# Altium PCB LEDControl1.PcbDoc (part 6 of 6)
Units mm, origin at the board's own origin, x right, y up, seen from the top; angles counter-clockwise.
Board outline 380 x 185 mm, 2 copper layers (Top Layer, Bottom Layer), stack 0.533 mm thick; 673 components, 368 nets, 1993 pads, 2553 vias.
Unrouted connection lines stored in the file: 1155.
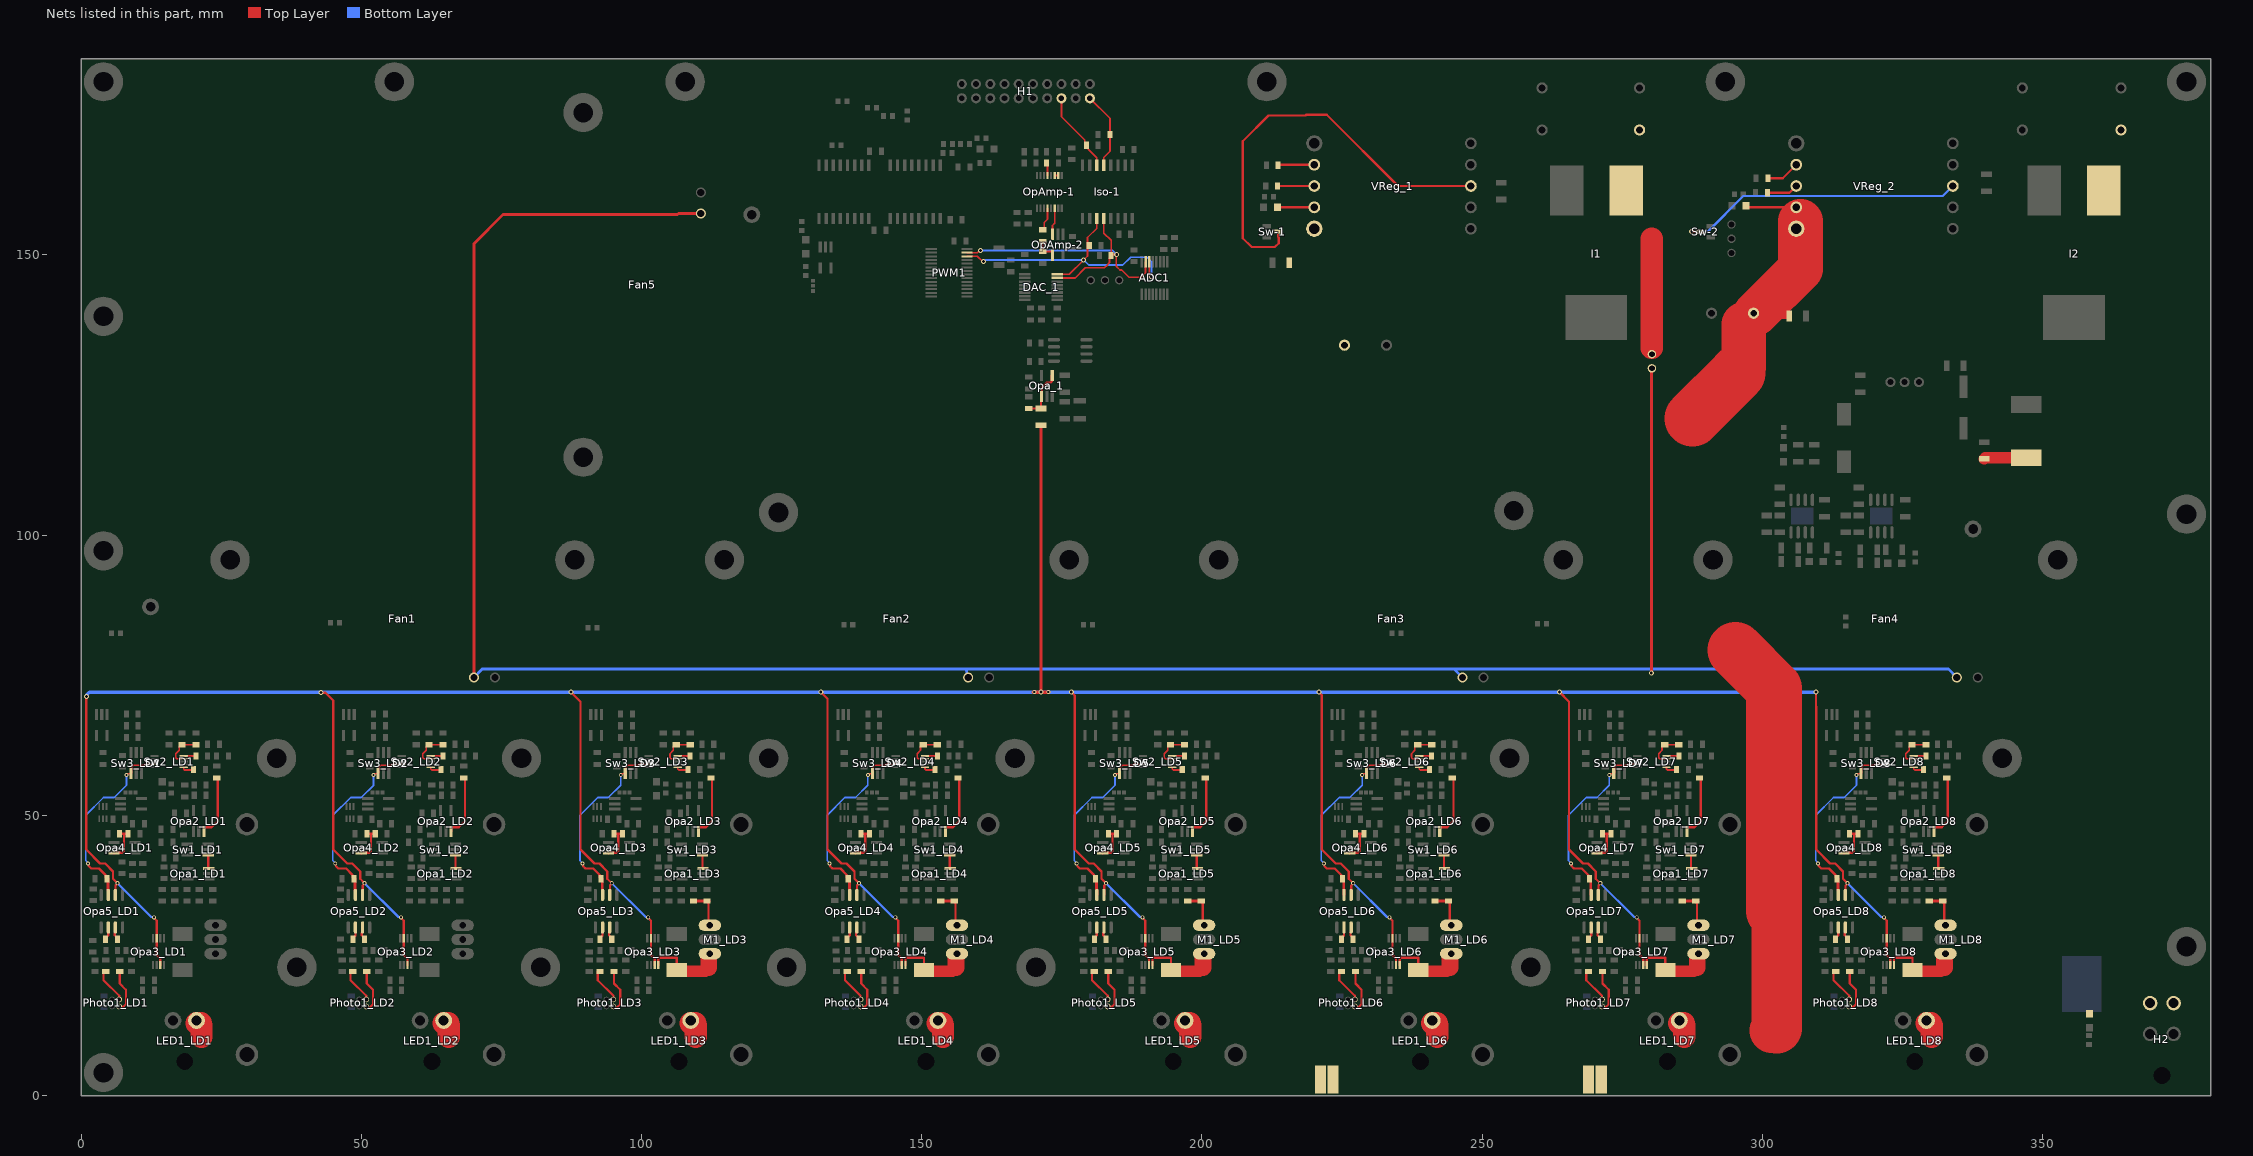
[diagram p6: the nets of this part, all layers, seen from the top]

## Via types
v1: diameter 0.7, hole 0.4, Top Layer to Bottom Layer, tented both sides, 1874 vias
v2: diameter 0.8, hole 0.5, Top Layer to Bottom Layer, tented both sides, 512 vias
v3: diameter 0.9, hole 0.5, Top Layer to Bottom Layer, tented both sides, 158 vias
v4: diameter 1.27, hole 0.711, Top Layer to Bottom Layer, tented both sides, 8 vias
v5: diameter 1.2, hole 0.7, Top Layer to Bottom Layer, tented both sides, 1 vias

## Nets (pads, with @x,y where several pads share a name; then routed paths per layer and width w, separated by ;. In a path a pad name is that pad's centre, name@x,y a point inside that pad or via, vN(x,y) a via of type N, cw(c..) or ccw(c..) an arc to the next point about the centre after c; other vN are vias at no path point) (continued)
NetM1_LD3_1: M1_LD3.1 R1-1_LD3.2 R2-1_LD3.1 | length 7
  Top Layer w0.4: M1_LD3.1@111.95,30.64 R1-1_LD3.2@111.95,34.65
  Top Layer w0.5: R2-1_LD3.1@109.3,34.7 R1-1_LD3.2@111.7,34.7
  Top Layer w0.8: R1-1_LD3.2@111.7,34.7 111.9,34.7 R1-1_LD3.2@111.95,34.65 ; M1_LD3.1@111.95,30.64 M1_LD3.1@112.2,30.39
NetM1_LD3_3: M1_LD3.3 Opa3_LD3.8 R5-1_LD3.1 | length 14.7
  Top Layer w0.4: Opa3_LD3.8@103,23.273 103,24.6 106.3,24.6 106.3,22.2 R5-1_LD3.1@106.5,22.2
  Top Layer w2: R5-1_LD3.1@106.5,22.2 111.4,22.2 ; M1_LD3.3@112,24.827 cw(c112.683,24.827) M1_LD3.3@112.2,25.31
  Top Layer w3: 112,22.8 M1_LD3.3@112,24.827
NetM1_LD4_1: M1_LD4.1 R1-1_LD4.2 R2-1_LD4.1 | length 7
  Top Layer w0.4: M1_LD4.1@156.05,30.64 R1-1_LD4.2@156.05,34.65
  Top Layer w0.5: R2-1_LD4.1@153.4,34.7 R1-1_LD4.2@155.8,34.7
  Top Layer w0.8: R1-1_LD4.2@155.8,34.7 156,34.7 R1-1_LD4.2@156.05,34.65 ; M1_LD4.1@156.05,30.64 M1_LD4.1@156.3,30.39
NetM1_LD4_3: M1_LD4.3 Opa3_LD4.8 R5-1_LD4.1 | length 14.7
  Top Layer w0.4: Opa3_LD4.8@147.1,23.273 147.1,24.6 150.4,24.6 150.4,22.2 R5-1_LD4.1@150.6,22.2
  Top Layer w2: R5-1_LD4.1@150.6,22.2 155.5,22.2 ; M1_LD4.3@156.1,24.827 cw(c156.783,24.827) M1_LD4.3@156.3,25.31
  Top Layer w3: 156.1,22.8 M1_LD4.3@156.1,24.827
NetM1_LD5_1: M1_LD5.1 R1-1_LD5.2 R2-1_LD5.1 | length 7
  Top Layer w0.4: M1_LD5.1@200.15,30.64 R1-1_LD5.2@200.15,34.65
  Top Layer w0.5: R2-1_LD5.1@197.5,34.7 R1-1_LD5.2@199.9,34.7
  Top Layer w0.8: R1-1_LD5.2@199.9,34.7 200.1,34.7 R1-1_LD5.2@200.15,34.65 ; M1_LD5.1@200.15,30.64 M1_LD5.1@200.4,30.39
NetM1_LD5_3: M1_LD5.3 Opa3_LD5.8 R5-1_LD5.1 | length 14.7
  Top Layer w0.4: Opa3_LD5.8@191.2,23.273 191.2,24.6 194.5,24.6 194.5,22.2 R5-1_LD5.1@194.7,22.2
  Top Layer w2: R5-1_LD5.1@194.7,22.2 199.6,22.2 ; M1_LD5.3@200.2,24.827 cw(c200.883,24.827) M1_LD5.3@200.4,25.31
  Top Layer w3: 200.2,22.8 M1_LD5.3@200.2,24.827
NetM1_LD6_1: M1_LD6.1 R1-1_LD6.2 R2-1_LD6.1 | length 7
  Top Layer w0.4: M1_LD6.1@244.25,30.64 R1-1_LD6.2@244.25,34.65
  Top Layer w0.5: R2-1_LD6.1@241.6,34.7 R1-1_LD6.2@244,34.7
  Top Layer w0.8: R1-1_LD6.2@244,34.7 244.2,34.7 R1-1_LD6.2@244.25,34.65 ; M1_LD6.1@244.25,30.64 M1_LD6.1@244.5,30.39
NetM1_LD6_3: M1_LD6.3 Opa3_LD6.8 R5-1_LD6.1 | length 14.7
  Top Layer w0.4: Opa3_LD6.8@235.3,23.273 235.3,24.6 238.6,24.6 238.6,22.2 R5-1_LD6.1@238.8,22.2
  Top Layer w2: R5-1_LD6.1@238.8,22.2 243.7,22.2 ; M1_LD6.3@244.3,24.827 cw(c244.983,24.827) M1_LD6.3@244.5,25.31
  Top Layer w3: 244.3,22.8 M1_LD6.3@244.3,24.827
NetM1_LD7_1: M1_LD7.1 R1-1_LD7.2 R2-1_LD7.1 | length 7
  Top Layer w0.4: M1_LD7.1@288.35,30.64 R1-1_LD7.2@288.35,34.65
  Top Layer w0.5: R2-1_LD7.1@285.7,34.7 R1-1_LD7.2@288.1,34.7
  Top Layer w0.8: R1-1_LD7.2@288.1,34.7 288.3,34.7 R1-1_LD7.2@288.35,34.65 ; M1_LD7.1@288.35,30.64 M1_LD7.1@288.6,30.39
NetM1_LD7_3: M1_LD7.3 Opa3_LD7.8 R5-1_LD7.1 | length 14.7
  Top Layer w0.4: Opa3_LD7.8@279.4,23.273 279.4,24.6 282.7,24.6 282.7,22.2 R5-1_LD7.1@282.9,22.2
  Top Layer w2: R5-1_LD7.1@282.9,22.2 287.8,22.2 ; M1_LD7.3@288.4,24.827 cw(c289.083,24.827) M1_LD7.3@288.6,25.31
  Top Layer w3: 288.4,22.8 M1_LD7.3@288.4,24.827
NetM1_LD8_1: M1_LD8.1 R1-1_LD8.2 R2-1_LD8.1 | length 7
  Top Layer w0.4: M1_LD8.1@332.45,30.64 R1-1_LD8.2@332.45,34.65
  Top Layer w0.5: R2-1_LD8.1@329.8,34.7 R1-1_LD8.2@332.2,34.7
  Top Layer w0.8: R1-1_LD8.2@332.2,34.7 332.4,34.7 R1-1_LD8.2@332.45,34.65 ; M1_LD8.1@332.45,30.64 M1_LD8.1@332.7,30.39
NetM1_LD8_3: M1_LD8.3 Opa3_LD8.8 R5-1_LD8.1 | length 14.7
  Top Layer w0.4: Opa3_LD8.8@323.5,23.273 323.5,24.6 326.8,24.6 326.8,22.2 R5-1_LD8.1@327,22.2
  Top Layer w2: R5-1_LD8.1@327,22.2 331.9,22.2 ; M1_LD8.3@332.5,24.827 cw(c333.183,24.827) M1_LD8.3@332.7,25.31
  Top Layer w3: 332.5,22.8 M1_LD8.3@332.5,24.827
NetOpa1_LD1_3: Opa1_LD1.3 Sw1_LD1.4 | length 2.5
  Top Layer w0.4: Sw1_LD1.4@22.7,42.95 22.7,40.625 22.775,40.55 Opa1_LD1.3@22.8,40.55
NetOpa1_LD2_3: Opa1_LD2.3 Sw1_LD2.4 | length 2.5
  Top Layer w0.4: Sw1_LD2.4@66.8,42.95 66.8,40.625 66.875,40.55 Opa1_LD2.3@66.9,40.55
NetOpa1_LD3_3: Opa1_LD3.3 Sw1_LD3.4 | length 2.5
  Top Layer w0.4: Sw1_LD3.4@110.9,42.95 110.9,40.625 110.975,40.55 Opa1_LD3.3@111,40.55
NetOpa1_LD4_3: Opa1_LD4.3 Sw1_LD4.4 | length 2.5
  Top Layer w0.4: Sw1_LD4.4@155,42.95 155,40.625 155.075,40.55 Opa1_LD4.3@155.1,40.55
NetOpa1_LD5_3: Opa1_LD5.3 Sw1_LD5.4 | length 2.5
  Top Layer w0.4: Sw1_LD5.4@199.1,42.95 199.1,40.625 199.175,40.55 Opa1_LD5.3@199.2,40.55
NetOpa1_LD6_3: Opa1_LD6.3 Sw1_LD6.4 | length 2.5
  Top Layer w0.4: Sw1_LD6.4@243.2,42.95 243.2,40.625 243.275,40.55 Opa1_LD6.3@243.3,40.55
NetOpa1_LD7_3: Opa1_LD7.3 Sw1_LD7.4 | length 2.5
  Top Layer w0.4: Sw1_LD7.4@287.3,42.95 287.3,40.625 287.375,40.55 Opa1_LD7.3@287.4,40.55
NetOpa1_LD8_3: Opa1_LD8.3 Sw1_LD8.4 | length 2.5
  Top Layer w0.4: Sw1_LD8.4@331.4,42.95 331.4,40.625 331.475,40.55 Opa1_LD8.3@331.5,40.55
NetOpa2_LD1_3: Opa2_LD1.3 R3-4_LD1.1 | length 11.4
  Top Layer w0.4: Opa2_LD1.3@21.95,47.1 21.95,47.825 22.025,47.9 23.3,47.9 24.4,49 24.4,56.5 R3-4_LD1.1@24.2,56.7
NetOpa2_LD2_3: Opa2_LD2.3 R3-4_LD2.1 | length 11.4
  Top Layer w0.4: Opa2_LD2.3@66.05,47.1 66.05,47.825 66.125,47.9 67.4,47.9 68.5,49 68.5,56.5 R3-4_LD2.1@68.3,56.7
NetOpa2_LD3_3: Opa2_LD3.3 R3-4_LD3.1 | length 11.4
  Top Layer w0.4: Opa2_LD3.3@110.15,47.1 110.15,47.825 110.225,47.9 111.5,47.9 112.6,49 112.6,56.5 R3-4_LD3.1@112.4,56.7
NetOpa2_LD4_3: Opa2_LD4.3 R3-4_LD4.1 | length 11.4
  Top Layer w0.4: Opa2_LD4.3@154.25,47.1 154.25,47.825 154.325,47.9 155.6,47.9 156.7,49 156.7,56.5 R3-4_LD4.1@156.5,56.7
NetOpa2_LD5_3: Opa2_LD5.3 R3-4_LD5.1@200.6,56.7 | length 11.4
  Top Layer w0.4: Opa2_LD5.3@198.35,47.1 198.35,47.825 198.425,47.9 199.7,47.9 200.8,49 200.8,56.5 R3-4_LD5.1@200.6,56.7
NetOpa2_LD6_3: Opa2_LD6.3 R3-4_LD6.1 | length 11.4
  Top Layer w0.4: Opa2_LD6.3@242.45,47.1 242.45,47.825 242.525,47.9 243.8,47.9 244.9,49 244.9,56.5 R3-4_LD6.1@244.7,56.7
NetOpa2_LD7_3: Opa2_LD7.3 R3-4_LD7.1 | length 11.4
  Top Layer w0.4: Opa2_LD7.3@286.55,47.1 286.55,47.825 286.625,47.9 287.9,47.9 289,49 289,56.5 R3-4_LD7.1@288.8,56.7
NetOpa2_LD8_3: Opa2_LD8.3 R3-4_LD8.1 | length 11.4
  Top Layer w0.4: Opa2_LD8.3@330.65,47.1 330.65,47.825 330.725,47.9 332,47.9 333.1,49 333.1,56.5 R3-4_LD8.1@332.9,56.7
NetOpa4_LD1_3: Opa4_LD1.3 R6-1_LD1.2 R7-1_LD1.1 | length 6.5
  Top Layer w0.4: Opa4_LD1.3@5.9,43.25 5.975,43.325 7.325,43.325 7.65,43.65 7.65,46.7 ; R7-1_LD1.1@6.9,46.7 7.65,46.7 ; R6-1_LD1.2@8.4,46.7 7.65,46.7
NetOpa4_LD2_3: Opa4_LD2.3 R6-1_LD2.2 R7-1_LD2.1 | length 6.5
  Top Layer w0.4: Opa4_LD2.3@50,43.25 50.075,43.325 51.425,43.325 51.75,43.65 51.75,46.7 ; R7-1_LD2.1@51,46.7 51.75,46.7 ; R6-1_LD2.2@52.5,46.7 51.75,46.7
NetOpa4_LD3_3: Opa4_LD3.3 R6-1_LD3.2 R7-1_LD3.1 | length 6.5
  Top Layer w0.4: Opa4_LD3.3@94.1,43.25 94.175,43.325 95.525,43.325 95.85,43.65 95.85,46.7 ; R7-1_LD3.1@95.1,46.7 95.85,46.7 ; R6-1_LD3.2@96.6,46.7 95.85,46.7
NetOpa4_LD4_3: Opa4_LD4.3 R6-1_LD4.2 R7-1_LD4.1 | length 6.5
  Top Layer w0.4: Opa4_LD4.3@138.2,43.25 138.275,43.325 139.625,43.325 139.95,43.65 139.95,46.7 ; R7-1_LD4.1@139.2,46.7 139.95,46.7 ; R6-1_LD4.2@140.7,46.7 139.95,46.7
NetOpa4_LD5_3: Opa4_LD5.3 R6-1_LD5.2 R7-1_LD5.1 | length 6.5
  Top Layer w0.4: Opa4_LD5.3@182.3,43.25 182.375,43.325 183.725,43.325 184.05,43.65 184.05,46.7 ; R7-1_LD5.1@183.3,46.7 184.05,46.7 ; R6-1_LD5.2@184.8,46.7 184.05,46.7
NetOpa4_LD6_3: Opa4_LD6.3 R6-1_LD6.2 R7-1_LD6.1 | length 6.5
  Top Layer w0.4: Opa4_LD6.3@226.4,43.25 226.475,43.325 227.825,43.325 228.15,43.65 228.15,46.7 ; R7-1_LD6.1@227.4,46.7 228.15,46.7 ; R6-1_LD6.2@228.9,46.7 228.15,46.7
NetOpa4_LD7_3: Opa4_LD7.3 R6-1_LD7.2 R7-1_LD7.1 | length 6.5
  Top Layer w0.4: Opa4_LD7.3@270.5,43.25 270.575,43.325 271.925,43.325 272.25,43.65 272.25,46.7 ; R7-1_LD7.1@271.5,46.7 272.25,46.7 ; R6-1_LD7.2@273,46.7 272.25,46.7
NetOpa4_LD8_3: Opa4_LD8.3 R6-1_LD8.2 R7-1_LD8.1 | length 6.5
  Top Layer w0.4: Opa4_LD8.3@314.6,43.25 314.675,43.325 316.025,43.325 316.35,43.65 316.35,46.7 ; R7-1_LD8.1@315.6,46.7 316.35,46.7 ; R6-1_LD8.2@317.1,46.7 316.35,46.7
NetOpa5_LD1_2: Opa5_LD1.2 R10-1_LD1.2 | length 2.5
  Top Layer w0.4: R10-1_LD1.2@4.4,27.9 4.4,28.1 4.86,28.56 Opa5_LD1.2@4.86,30.2
NetOpa5_LD1_3: Opa5_LD1.3 R10-1_LD1.1 | length 2.4
  Top Layer w0.4: Opa5_LD1.3@6.13,30 6.13,29.146 6.001,29.017 6.001,28.599 6.5,28.1 R10-1_LD1.1@6.5,27.9
NetOpa5_LD2_2: Opa5_LD2.2 R10-1_LD2.2 | length 2.5
  Top Layer w0.4: R10-1_LD2.2@48.5,27.9 48.5,28.1 48.96,28.56 Opa5_LD2.2@48.96,30.2
NetOpa5_LD2_3: Opa5_LD2.3 R10-1_LD2.1 | length 2.4
  Top Layer w0.4: Opa5_LD2.3@50.23,30 50.23,29.146 50.101,29.017 50.101,28.599 50.6,28.1 R10-1_LD2.1@50.6,27.9
NetOpa5_LD3_2: Opa5_LD3.2 R10-1_LD3.2 | length 2.5
  Top Layer w0.4: R10-1_LD3.2@92.6,27.9 92.6,28.1 93.06,28.56 Opa5_LD3.2@93.06,30.2
NetOpa5_LD3_3: Opa5_LD3.3 R10-1_LD3.1 | length 2.4
  Top Layer w0.4: Opa5_LD3.3@94.33,30 94.33,29.146 94.201,29.017 94.201,28.599 94.7,28.1 R10-1_LD3.1@94.7,27.9
NetOpa5_LD4_2: Opa5_LD4.2 R10-1_LD4.2 | length 2.5
  Top Layer w0.4: R10-1_LD4.2@136.7,27.9 136.7,28.1 137.16,28.56 Opa5_LD4.2@137.16,30.2
NetOpa5_LD4_3: Opa5_LD4.3 R10-1_LD4.1 | length 2.4
  Top Layer w0.4: Opa5_LD4.3@138.43,30 138.43,29.146 138.301,29.017 138.301,28.599 138.8,28.1 R10-1_LD4.1@138.8,27.9
NetOpa5_LD5_2: Opa5_LD5.2 R10-1_LD5.2 | length 2.5
  Top Layer w0.4: R10-1_LD5.2@180.8,27.9 180.8,28.1 181.26,28.56 Opa5_LD5.2@181.26,30.2
NetOpa5_LD5_3: Opa5_LD5.3 R10-1_LD5.1 | length 2.4
  Top Layer w0.4: Opa5_LD5.3@182.53,30 182.53,29.146 182.401,29.017 182.401,28.599 182.9,28.1 R10-1_LD5.1@182.9,27.9
NetOpa5_LD6_2: Opa5_LD6.2 R10-1_LD6.2 | length 2.5
  Top Layer w0.4: R10-1_LD6.2@224.9,27.9 224.9,28.1 225.36,28.56 Opa5_LD6.2@225.36,30.2
NetOpa5_LD6_3: Opa5_LD6.3 R10-1_LD6.1 | length 2.4
  Top Layer w0.4: Opa5_LD6.3@226.63,30 226.63,29.146 226.501,29.017 226.501,28.599 227,28.1 R10-1_LD6.1@227,27.9
NetOpa5_LD7_2: Opa5_LD7.2 R10-1_LD7.2 | length 2.5
  Top Layer w0.4: R10-1_LD7.2@269,27.9 269,28.1 269.46,28.56 Opa5_LD7.2@269.46,30.2
NetOpa5_LD7_3: Opa5_LD7.3 R10-1_LD7.1 | length 2.4
  Top Layer w0.4: Opa5_LD7.3@270.73,30 270.73,29.146 270.601,29.017 270.601,28.599 271.1,28.1 R10-1_LD7.1@271.1,27.9
NetOpa5_LD8_2: Opa5_LD8.2 R10-1_LD8.2 | length 2.5
  Top Layer w0.4: R10-1_LD8.2@313.1,27.9 313.1,28.1 313.56,28.56 Opa5_LD8.2@313.56,30.2
NetOpa5_LD8_3: Opa5_LD8.3 R10-1_LD8.1 | length 2.4
  Top Layer w0.4: Opa5_LD8.3@314.83,30 314.83,29.146 314.701,29.017 314.701,28.599 315.2,28.1 R10-1_LD8.1@315.2,27.9
NetOpa_1_1: Opa_1.1 Opa_1.4 R9-1.1 R10-1.1 | length 9.3
  Top Layer w0.4: R10-1.1@169.1,122.6 R9-1.1@171.3,122.6 171.3,123.925 171.4,124.025 Opa_1.1@171.4,124.75 171.475,124.825 171.475,126.384 172.316,127.225 172.991,127.225 173.225,127.459 173.225,128.425 Opa_1.4@173.3,128.5
NetOpAmp-1_6: OpAmp-1.6 OpAmp-2.3 | length 4.8
  Top Layer w0.3: OpAmp-2.3@173.35,153.7 173.35,155.25 173.735,155.635 OpAmp-1.6@173.735,158.329
NetOpAmp-1_10: OpAmp-1.10 OpAmp-1.11 | length 0.6
  Top Layer w0.3: OpAmp-1.11@173.735,164.171 OpAmp-1.10@174.37,164.171
NetOpAmp-1_13: OpAmp-1.13 R3-2.1 | length 2.3
  Top Layer w0.3: R3-2.1@172.3,166.4 172.465,166.235 OpAmp-1.13@172.465,164.171
NetOpAmp-2_4: OpAmp-2.4 R3-3.2 R3-4.2 | length 4.1
  Top Layer w0.3: R3-4.2@171.6,152.4 R3-3.2@171.6,150.6 173.225,150.6 173.35,150.475 OpAmp-2.4@173.35,149.95
NetPhoto1_LD1_3: Photo1_LD1.3 S.2@6.9,22.1 | length 7.7
  Top Layer w0.4: Photo1_LD1.3@6.8,15.7 7.4,15.7 8,16.3 8,18.9 6.9,20 S.2@6.9,22.1
NetPhoto1_LD1_4: Photo1_LD1.4 S.2@4.4,22.1 | length 6.3
  Top Layer w0.4: S.2@4,22.1 4,20.6 6.8,17.8 Photo1_LD1.4@6.8,16.95
NetPhoto1_LD2_3: Photo1_LD2.3 S.2@51,22.1 | length 7.7
  Top Layer w0.4: Photo1_LD2.3@50.9,15.7 51.5,15.7 52.1,16.3 52.1,18.9 51,20 S.2@51,22.1
NetPhoto1_LD2_4: Photo1_LD2.4 S.2@48.5,22.1 | length 6.3
  Top Layer w0.4: S.2@48.1,22.1 48.1,20.6 50.9,17.8 Photo1_LD2.4@50.9,16.95
NetPhoto1_LD3_3: Photo1_LD3.3 S.2@95.1,22.1 | length 7.7
  Top Layer w0.4: Photo1_LD3.3@95,15.7 95.6,15.7 96.2,16.3 96.2,18.9 95.1,20 S.2@95.1,22.1
NetPhoto1_LD3_4: Photo1_LD3.4 S.2@92.6,22.1 | length 6.3
  Top Layer w0.4: S.2@92.2,22.1 92.2,20.6 95,17.8 Photo1_LD3.4@95,16.95
NetPhoto1_LD4_3: Photo1_LD4.3 S.2@139.2,22.1 | length 7.7
  Top Layer w0.4: Photo1_LD4.3@139.1,15.7 139.7,15.7 140.3,16.3 140.3,18.9 139.2,20 S.2@139.2,22.1
NetPhoto1_LD4_4: Photo1_LD4.4 S.2@136.7,22.1 | length 6.3
  Top Layer w0.4: S.2@136.3,22.1 136.3,20.6 139.1,17.8 Photo1_LD4.4@139.1,16.95
NetPhoto1_LD5_3: Photo1_LD5.3 R1-7_LD5.2 | length 7.7
  Top Layer w0.4: Photo1_LD5.3@183.2,15.7 183.8,15.7 184.4,16.3 184.4,18.9 183.3,20 R1-7_LD5.2@183.3,22.1
NetPhoto1_LD5_4: Photo1_LD5.4 R1-6_LD5.2 | length 6.3
  Top Layer w0.4: R1-6_LD5.2@180.4,22.1 180.4,20.6 183.2,17.8 Photo1_LD5.4@183.2,16.95
NetPhoto1_LD6_3: Photo1_LD6.3 S.2@227.4,22.1 | length 7.7
  Top Layer w0.4: Photo1_LD6.3@227.3,15.7 227.9,15.7 228.5,16.3 228.5,18.9 227.4,20 S.2@227.4,22.1
NetPhoto1_LD6_4: Photo1_LD6.4 S.2@224.9,22.1 | length 6.3
  Top Layer w0.4: S.2@224.5,22.1 224.5,20.6 227.3,17.8 Photo1_LD6.4@227.3,16.95
NetPhoto1_LD7_3: Photo1_LD7.3 S.2@271.5,22.1 | length 7.7
  Top Layer w0.4: Photo1_LD7.3@271.4,15.7 272,15.7 272.6,16.3 272.6,18.9 271.5,20 S.2@271.5,22.1
NetPhoto1_LD7_4: Photo1_LD7.4 S.2@269,22.1 | length 6.3
  Top Layer w0.4: S.2@268.6,22.1 268.6,20.6 271.4,17.8 Photo1_LD7.4@271.4,16.95
NetPhoto1_LD8_3: Photo1_LD8.3 S.2@315.6,22.1 | length 7.7
  Top Layer w0.4: Photo1_LD8.3@315.5,15.7 316.1,15.7 316.7,16.3 316.7,18.9 315.6,20 S.2@315.6,22.1
NetPhoto1_LD8_4: Photo1_LD8.4 S.2@313.1,22.1 | length 6.3
  Top Layer w0.4: S.2@312.7,22.1 312.7,20.6 315.5,17.8 Photo1_LD8.4@315.5,16.95
NetR1-4_LD1_1: S.1@20.5,60.6 Sw2_LD1.10 | length 2.2
  Top Layer w0.3: Sw2_LD1.10@18.3,60.6 S.1@20.5,60.6
NetR1-4_LD2_1: S.1@64.6,60.6 Sw2_LD2.10 | length 2.2
  Top Layer w0.3: Sw2_LD2.10@62.4,60.6 S.1@64.6,60.6
NetR1-4_LD3_1: S.1@108.7,60.6 Sw2_LD3.10 | length 2.2
  Top Layer w0.3: Sw2_LD3.10@106.5,60.6 S.1@108.7,60.6
NetR1-4_LD4_1: S.1@152.8,60.6 Sw2_LD4.10 | length 2.2
  Top Layer w0.3: Sw2_LD4.10@150.6,60.6 S.1@152.8,60.6
NetR1-4_LD5_1: R3-4_LD5.1@196.9,60.6 Sw2_LD5.10 | length 2.2
  Top Layer w0.3: Sw2_LD5.10@194.7,60.6 R3-4_LD5.1@196.9,60.6
NetR1-4_LD6_1: S.1@241,60.6 Sw2_LD6.10 | length 2.2
  Top Layer w0.3: Sw2_LD6.10@238.8,60.6 S.1@241,60.6
NetR1-4_LD7_1: S.1@285.1,60.6 Sw2_LD7.10 | length 2.2
  Top Layer w0.3: Sw2_LD7.10@282.9,60.6 S.1@285.1,60.6
NetR1-4_LD8_1: R1-4.1 Sw2_LD8.10 | length 2.2
  Top Layer w0.3: Sw2_LD8.10@327,60.6 R1-4.1@329.2,60.6
NetR1-5_LD1_2: R1-5_LD1.2 R14-1_LD1.1 Sw2_LD1.9 | length 6.9
  Top Layer w0.3: Sw2_LD1.9@18.3,60.1 17.1,60.1 16.9,60.3 16.9,61 17.5,61.6 17.5,62.3 17.8,62.6 R14-1_LD1.1@18,62.6 R1-5_LD1.2@20.5,62.6
NetR1-5_LD2_2: R1-5_LD2.2 R14-1_LD2.1 Sw2_LD2.9 | length 6.9
  Top Layer w0.3: Sw2_LD2.9@62.4,60.1 61.2,60.1 61,60.3 61,61 61.6,61.6 61.6,62.3 61.9,62.6 R14-1_LD2.1@62.1,62.6 R1-5_LD2.2@64.6,62.6
NetR1-5_LD3_2: R1-5_LD3.2 R14-1_LD3.1 Sw2_LD3.9 | length 6.9
  Top Layer w0.3: Sw2_LD3.9@106.5,60.1 105.3,60.1 105.1,60.3 105.1,61 105.7,61.6 105.7,62.3 106,62.6 R14-1_LD3.1@106.2,62.6 R1-5_LD3.2@108.7,62.6
NetR1-5_LD4_2: R1-5_LD4.2 R14-1_LD4.1 Sw2_LD4.9 | length 6.9
  Top Layer w0.3: Sw2_LD4.9@150.6,60.1 149.4,60.1 149.2,60.3 149.2,61 149.8,61.6 149.8,62.3 150.1,62.6 R14-1_LD4.1@150.3,62.6 R1-5_LD4.2@152.8,62.6
NetR1-5_LD5_2: R1-5_LD5.2 R14-1_LD5.1 Sw2_LD5.9 | length 6.9
  Top Layer w0.3: Sw2_LD5.9@194.7,60.1 193.5,60.1 193.3,60.3 193.3,61 193.9,61.6 193.9,62.3 194.2,62.6 R14-1_LD5.1@194.4,62.6 R1-5_LD5.2@196.9,62.6
NetR1-5_LD6_2: R1-5_LD6.2 R14-1_LD6.1 Sw2_LD6.9 | length 6.9
  Top Layer w0.3: Sw2_LD6.9@238.8,60.1 237.6,60.1 237.4,60.3 237.4,61 238,61.6 238,62.3 238.3,62.6 R14-1_LD6.1@238.5,62.6 R1-5_LD6.2@241,62.6
NetR1-5_LD7_2: R1-5_LD7.2 R14-1_LD7.1 Sw2_LD7.9 | length 6.9
  Top Layer w0.3: Sw2_LD7.9@282.9,60.1 281.7,60.1 281.5,60.3 281.5,61 282.1,61.6 282.1,62.3 282.4,62.6 R14-1_LD7.1@282.6,62.6 R1-5_LD7.2@285.1,62.6
NetR1-5_LD8_2: R1-5_LD8.2 R14-1_LD8.1 Sw2_LD8.9 | length 6.9
  Top Layer w0.3: Sw2_LD8.9@327,60.1 325.8,60.1 325.6,60.3 325.6,61 326.2,61.6 326.2,62.3 326.5,62.6 R14-1_LD8.1@326.7,62.6 R1-5_LD8.2@329.2,62.6
NetR3-3_LD1_2: R3-3_LD1.2 Sw2_LD1.6 | length 2.2
  Top Layer w0.3: Sw2_LD1.6@18.3,58.6 18.3,58.276 18.476,58.1 20,58.1 R3-3_LD1.2@20.1,58.2
NetR3-3_LD2_2: R3-3_LD2.2 Sw2_LD2.6 | length 2.2
  Top Layer w0.3: Sw2_LD2.6@62.4,58.6 62.4,58.276 62.576,58.1 64.1,58.1 R3-3_LD2.2@64.2,58.2
NetR3-3_LD3_2: R3-3_LD3.2 Sw2_LD3.6 | length 2.2
  Top Layer w0.3: Sw2_LD3.6@106.5,58.6 106.5,58.276 106.676,58.1 108.2,58.1 R3-3_LD3.2@108.3,58.2
NetR3-3_LD4_2: R3-3_LD4.2 Sw2_LD4.6 | length 2.2
  Top Layer w0.3: Sw2_LD4.6@150.6,58.6 150.6,58.276 150.776,58.1 152.3,58.1 R3-3_LD4.2@152.4,58.2
NetR3-3_LD5_2: R3-3_LD5.2 Sw2_LD5.6 | length 2.2
  Top Layer w0.3: Sw2_LD5.6@194.7,58.6 194.7,58.276 194.876,58.1 196.4,58.1 R3-3_LD5.2@196.5,58.2
NetR3-3_LD6_2: R3-3_LD6.2 Sw2_LD6.6 | length 2.2
  Top Layer w0.3: Sw2_LD6.6@238.8,58.6 238.8,58.276 238.976,58.1 240.5,58.1 R3-3_LD6.2@240.6,58.2
NetR3-3_LD7_2: R3-3_LD7.2 Sw2_LD7.6 | length 2.2
  Top Layer w0.3: Sw2_LD7.6@282.9,58.6 282.9,58.276 283.076,58.1 284.6,58.1 R3-3_LD7.2@284.7,58.2
NetR3-3_LD8_2: R3-3_LD8.2 Sw2_LD8.6 | length 2.2
  Top Layer w0.3: Sw2_LD8.6@327,58.6 327,58.276 327.176,58.1 328.7,58.1 R3-3_LD8.2@328.8,58.2
NetRLim-1_1: RLim-1.1 VReg_1.5 | length 6.5
  Top Layer w0.4: RLim-1.1@213.6,166 213.71,166.11 VReg_1.5@220.06,166.11
NetRLim-2_1: RLim-2.1 VReg_2.5 | length 6.1
  Top Layer w0.4: RLim-2.1@301,163.7 303.65,163.7 VReg_2.5@306.06,166.11
NetRTrim1_1: RTrim1.1 VReg_1.6 | length 6.6
  Top Layer w0.4: RTrim1.1@213.5,162.3 VReg_1.6@220.06,162.3
NetRTrim2_1: RTrim2.1 VReg_2.6 | length 5.7
  Top Layer w0.4: RTrim2.1@300.9,161.1 304.86,161.1 VReg_2.6@306.06,162.3
NetSw-1_3: Sw-1.3 VReg_1.2 | length 74.7
  Top Layer w0.4: Sw-1.3@213.6,154.15 213.6,153.3 213.7,153.2 213.7,152.1 213,151.4 208.9,151.4 207.3,153 207.3,170.3 211.9,174.9 218.5,174.9 218.6,175 222.3,175 235,162.3 VReg_1.2@248,162.3
NetSw-2_3: Sw-2.3 VReg_2.2 | length 52.1
  Top Layer w0.4: v3(287.4,154.2) 287.45,154.15 Sw-2.3@288.8,154.15 288.75,154.2 Sw-2.3@288.1,154.2
  Bottom Layer w0.4: v3(287.4,154.2) 290.299,154.2 296.599,160.5 332.2,160.5 VReg_2.2@334,162.3
OpticalSense_LD1: Opa5_LD1.7 R11-2_LD1.1 Sw2_LD1.4 Sw3_LD1.1 | length 34.3
  Top Layer w0.3: v1(1.261,41.407) 1.338,41.331 1.338,40.962 1.4,40.9 ; v1(8.1,57.2) 8.35,57.45 Sw3_LD1.1@8.9,57.45 9.025,57.575 9.025,58.609 9.361,58.946 11.246,58.946 11.4,59.1 Sw2_LD1.4@13.1,59.1
  Top Layer w0.4: 1.4,40.9 1.8,40.5 3.2,40.5 4.35,39.35 4.35,38.95 R11-2_LD1.1@4.6,38.7
  Top Layer w0.5: R11-2_LD1.1@4.8,38.7 4.8,36.687 4.86,36.627 Opa5_LD1.7@4.86,35.8
  Bottom Layer w0.3: v1(1.261,41.407) 1.261,41.515 0.824,41.952 0.824,50.024 4,53.2 5.9,53.2 8.1,55.4 v1(8.1,57.2)
OpticalSense_LD2: Opa5_LD2.7 R11-2_LD2.1 Sw2_LD2.4 Sw3_LD2.1 | length 34.3
  Top Layer w0.3: v1(45.361,41.407) 45.438,41.331 45.438,40.962 45.5,40.9 ; v1(52.2,57.2) 52.45,57.45 Sw3_LD2.1@53,57.45 53.125,57.575 53.125,58.609 53.461,58.946 55.346,58.946 55.5,59.1 Sw2_LD2.4@57.2,59.1
  Top Layer w0.4: 45.5,40.9 45.9,40.5 47.3,40.5 48.45,39.35 48.45,38.95 R11-2_LD2.1@48.7,38.7
  Top Layer w0.5: R11-2_LD2.1@48.9,38.7 48.9,36.687 48.96,36.627 Opa5_LD2.7@48.96,35.8
  Bottom Layer w0.3: v1(45.361,41.407) 45.361,41.515 44.924,41.952 44.924,50.024 48.1,53.2 50,53.2 52.2,55.4 v1(52.2,57.2)
OpticalSense_LD3: Opa5_LD3.7 R11-2_LD3.1 Sw2_LD3.4 Sw3_LD3.1 | length 34.3
  Top Layer w0.3: v1(89.461,41.407) 89.538,41.331 89.538,40.962 89.6,40.9 ; v1(96.3,57.2) 96.55,57.45 Sw3_LD3.1@97.1,57.45 97.225,57.575 97.225,58.609 97.561,58.946 99.446,58.946 99.6,59.1 Sw2_LD3.4@101.3,59.1
  Top Layer w0.4: 89.6,40.9 90,40.5 91.4,40.5 92.55,39.35 92.55,38.95 R11-2_LD3.1@92.8,38.7
  Top Layer w0.5: R11-2_LD3.1@93,38.7 93,36.687 93.06,36.627 Opa5_LD3.7@93.06,35.8
  Bottom Layer w0.3: v1(89.461,41.407) 89.461,41.515 89.024,41.952 89.024,50.024 92.2,53.2 94.1,53.2 96.3,55.4 v1(96.3,57.2)
OpticalSense_LD4: Opa5_LD4.7 R11-2_LD4.1 Sw2_LD4.4 Sw3_LD4.1 | length 34.3
  Top Layer w0.3: v1(133.561,41.407) 133.638,41.331 133.638,40.962 133.7,40.9 ; v1(140.4,57.2) 140.65,57.45 Sw3_LD4.1@141.2,57.45 141.325,57.575 141.325,58.609 141.661,58.946 143.546,58.946 143.7,59.1 Sw2_LD4.4@145.4,59.1
  Top Layer w0.4: 133.7,40.9 134.1,40.5 135.5,40.5 136.65,39.35 136.65,38.95 R11-2_LD4.1@136.9,38.7
  Top Layer w0.5: R11-2_LD4.1@137.1,38.7 137.1,36.687 137.16,36.627 Opa5_LD4.7@137.16,35.8
  Bottom Layer w0.3: v1(133.561,41.407) 133.561,41.515 133.124,41.952 133.124,50.024 136.3,53.2 138.2,53.2 140.4,55.4 v1(140.4,57.2)
OpticalSense_LD5: Opa5_LD5.7 R11-2_LD5.1 Sw2_LD5.4 Sw3_LD5.1 | length 34.3
  Top Layer w0.3: v1(177.661,41.407) 177.738,41.331 177.738,40.962 177.8,40.9 ; v1(184.5,57.2) 184.75,57.45 Sw3_LD5.1@185.3,57.45 185.425,57.575 185.425,58.609 185.761,58.946 187.646,58.946 187.8,59.1 Sw2_LD5.4@189.5,59.1
  Top Layer w0.4: 177.8,40.9 178.2,40.5 179.6,40.5 180.75,39.35 180.75,38.95 R11-2_LD5.1@181,38.7
  Top Layer w0.5: R11-2_LD5.1@181.2,38.7 181.2,36.687 181.26,36.627 Opa5_LD5.7@181.26,35.8
  Bottom Layer w0.3: v1(177.661,41.407) 177.661,41.515 177.224,41.952 177.224,50.024 180.4,53.2 182.3,53.2 184.5,55.4 v1(184.5,57.2)
OpticalSense_LD6: Opa5_LD6.7 R11-2_LD6.1 Sw2_LD6.4 Sw3_LD6.1 | length 34.3
  Top Layer w0.3: v1(221.761,41.407) 221.838,41.331 221.838,40.962 221.9,40.9 ; v1(228.6,57.2) 228.85,57.45 Sw3_LD6.1@229.4,57.45 229.525,57.575 229.525,58.609 229.861,58.946 231.746,58.946 231.9,59.1 Sw2_LD6.4@233.6,59.1
  Top Layer w0.4: 221.9,40.9 222.3,40.5 223.7,40.5 224.85,39.35 224.85,38.95 R11-2_LD6.1@225.1,38.7
  Top Layer w0.5: R11-2_LD6.1@225.3,38.7 225.3,36.687 225.36,36.627 Opa5_LD6.7@225.36,35.8
  Bottom Layer w0.3: v1(221.761,41.407) 221.761,41.515 221.324,41.952 221.324,50.024 224.5,53.2 226.4,53.2 228.6,55.4 v1(228.6,57.2)
OpticalSense_LD7: Opa5_LD7.7 R11-2_LD7.1 Sw2_LD7.4 Sw3_LD7.1 | length 34.3
  Top Layer w0.3: v1(265.861,41.407) 265.938,41.331 265.938,40.962 266,40.9 ; v1(272.7,57.2) 272.95,57.45 Sw3_LD7.1@273.5,57.45 273.625,57.575 273.625,58.609 273.961,58.946 275.846,58.946 276,59.1 Sw2_LD7.4@277.7,59.1
  Top Layer w0.4: 266,40.9 266.4,40.5 267.8,40.5 268.95,39.35 268.95,38.95 R11-2_LD7.1@269.2,38.7
  Top Layer w0.5: R11-2_LD7.1@269.4,38.7 269.4,36.687 269.46,36.627 Opa5_LD7.7@269.46,35.8
  Bottom Layer w0.3: v1(265.861,41.407) 265.861,41.515 265.424,41.952 265.424,50.024 268.6,53.2 270.5,53.2 272.7,55.4 v1(272.7,57.2)
OpticalSense_LD8: Opa5_LD8.7 R11-2_LD8.1 Sw2_LD8.4 Sw3_LD8.1 | length 34.3
  Top Layer w0.3: v1(309.961,41.407) 310.038,41.331 310.038,40.962 310.1,40.9 ; v1(316.8,57.2) 317.05,57.45 Sw3_LD8.1@317.6,57.45 317.725,57.575 317.725,58.609 318.061,58.946 319.946,58.946 320.1,59.1 Sw2_LD8.4@321.8,59.1
  Top Layer w0.4: 310.1,40.9 310.5,40.5 311.9,40.5 313.05,39.35 313.05,38.95 R11-2_LD8.1@313.3,38.7
  Top Layer w0.5: R11-2_LD8.1@313.5,38.7 313.5,36.687 313.56,36.627 Opa5_LD8.7@313.56,35.8
  Bottom Layer w0.3: v1(309.961,41.407) 309.961,41.515 309.524,41.952 309.524,50.024 312.7,53.2 314.6,53.2 316.8,55.4 v1(316.8,57.2)
SCL: ADC1.14 DAC_1.16 Iso-1.11 PWM1.26 R1-2.1@179.9,151.7 | length 54.6
  Top Layer w0.3: PWM1.26@158.1,149.75 159.941,149.75 v3@161.049,148.642 ; DAC_1.16@174.2,146.55 176.35,146.55 v3(178.9,149.1) 179.6,149.8 179.6,153.1 181.23,154.73 Iso-1.11@181.23,156.5 ; ADC1.14@190.6,148.8 190.6,146.662 191,146.262 v3(191,146.1)
  Bottom Layer w0.3: v3@161.049,148.642 161.049,148.749 161.4,149.1 v3(178.9,149.1) 179.8,148.2 185.9,148.2 187.3,149.6 190.2,149.6 191,148.8 v3(191,146.1)
  other v3: 161.049,148.842
SCL0: H1.13 Iso-1.6 R0-2.1 | length 14.6
  Top Layer w0.3: H1.13@174.94,177.96 174.94,174.66 179.1,170.5 179.1,169.9 179.7,169.3 179.7,168.851 181.23,167.321 Iso-1.6@181.23,166
SDA: ADC1.15 DAC_1.15 Iso-1.12 PWM1.27 R1-1.2 | length 57.8
  Top Layer w0.3: PWM1.27@158.1,150.4 159.938,150.4 160.338,150.8 v3(160.5,150.8) ; DAC_1.15@174.2,145.9 177.4,145.9 179.2,147.7 182.6,147.7 183,148.1 183.5,148.6 183.5,149.4 183.7,149.6 R1-1.2@183.9,149.6 ; Iso-1.12@182.5,156.5 182.5,153.9 183.8,152.6 R1-1.2@183.8,149.9 ; R1-1.2@183.8,149.7 R1-1.2@183.8,149.9 ; ADC1.15@189.95,148.8 189.95,146.85 189.1,146 187,146 185.7,147.3 185.4,147.3 184.706,147.994 184.706,149.987 v3(184.794,150.075) 183.975,150.075 R1-1.2@183.8,149.9
  Bottom Layer w0.3: v3(160.5,150.8) 184.069,150.8 v3(184.794,150.075)
SDA0: H1.11 Iso-1.5 R0-1.2 | length 13.9
  Top Layer w0.3: H1.11@180.02,177.96 183.6,174.38 R0-1.2@183.6,171.5 183.6,168.5 182.5,167.4 Iso-1.5@182.5,166
Vfan: Fan1.1 Fan2.1 Fan3.1 Fan4.1 Fan5.1 J_FAN.2 | length 445
  Top Layer w0.5: Fan1.1@70.1,74.6 70.1,152 75.3,157.2 106.4,157.2 106.6,157.4 Fan5.1@110.6,157.4 ; v3(280.2,75.4) 280.25,75.45 280.25,129.71 J_FAN.2@280.3,129.76
  Bottom Layer w0.5: Fan1.1@70.1,74.6 71.6,76.1 157.7,76.1 ; Fan2.1@158.3,74.6 158.051,74.849 158.051,75.749 157.7,76.1 ; Fan3.1@246.5,74.6 245,76.1 ; v3(280.2,75.4) 280.2,76.1 ; Fan4.1@334.7,74.6 333.2,76.1 280.2,76.1 ; 157.7,76.1 245,76.1 ; 245,76.1 280.2,76.1
Vin: C2-12.1 CE-3.1 CE-5.1 H2.3 H2.4 I1.1 I2.1 I3.1 J_FAN.1 LED1-2.2 | length 27.1
  Top Layer w2: C2-12.1@339.6,113.6 339.8,113.8 I3.1@347.1,113.8
  Top Layer w4: 280.3,133.4 280.3,152.9
VL_LD1: Opa3_LD1.3 Opa3_LD1.7 Opa3_LD2.3 Opa3_LD2.7 Opa3_LD3.3 Opa3_LD3.7 Opa3_LD4.3 Opa3_LD4.7 Opa3_LD5.3 Opa3_LD5.7 Opa3_LD6.3 Opa3_LD6.7 Opa3_LD7.3 Opa3_LD7.7 Opa3_LD8.3 Opa3_LD8.7 Opa5_LD1.6 Opa5_LD2.6 Opa5_LD3.6 Opa5_LD4.6 Opa5_LD5.6 Opa5_LD6.6 Opa5_LD7.6 Opa5_LD8.6 R9-1.2 | length 820
  Top Layer w0.4: v3(1,71.2) 0.908,71.108 0.908,43.892 3.4,41.4 4.3,41.4 5.7,40 5.7,38.7 v1(6.5,37.9) 6.5,37.819 6.168,37.487 6.168,35.838 Opa5_LD1.6@6.13,35.8 ; v1(13,31.8) 13,31.719 13.5,31.219 Opa3_LD1.3@13.5,28.073 13.5,25.1 14.15,24.45 Opa3_LD1.7@14.15,23.273 ; v3(42.8,71.9) 43.6,71.9 45.008,70.492 45.008,43.892 47.5,41.4 48.4,41.4 49.8,40 49.8,38.7 v1(50.6,37.9) 50.6,37.819 50.268,37.487 50.268,35.838 Opa5_LD2.6@50.23,35.8 ; v1(57.1,31.8) 57.1,31.719 57.6,31.219 Opa3_LD2.3@57.6,28.073 57.6,25.1 58.25,24.45 Opa3_LD2.7@58.25,23.273 ; v3(87.4,72) 89.108,70.292 89.108,43.892 91.6,41.4 92.5,41.4 93.9,40 93.9,38.7 v1(94.7,37.9) 94.7,37.819 94.368,37.487 94.368,35.838 Opa5_LD3.6@94.33,35.8 ; v1(101.2,31.8) 101.2,31.719 101.7,31.219 Opa3_LD3.3@101.7,28.073 101.7,25.1 102.35,24.45 Opa3_LD3.7@102.35,23.273 ; v3(132,72) 133.208,70.792 133.208,43.892 135.7,41.4 136.6,41.4 138,40 138,38.7 v1(138.8,37.9) 138.8,37.819 138.468,37.487 138.468,35.838 Opa5_LD4.6@138.43,35.8 ; v1(145.3,31.8) 145.3,31.719 145.8,31.219 Opa3_LD4.3@145.8,28.073 145.8,25.1 146.45,24.45 Opa3_LD4.7@146.45,23.273 ; v3(176.7,72) 177.308,71.392 177.308,43.892 179.8,41.4 180.7,41.4 182.1,40 182.1,38.7 v1(182.9,37.9) 182.9,37.819 182.568,37.487 182.568,35.838 Opa5_LD5.6@182.53,35.8 ; v1(189.4,31.8) 189.4,31.719 189.9,31.219 Opa3_LD5.3@189.9,28.073 189.9,25.1 190.55,24.45 Opa3_LD5.7@190.55,23.273 ; v3(220.9,72) 221.408,71.492 221.408,43.892 223.9,41.4 224.8,41.4 226.2,40 226.2,38.7 v1(227,37.9) 227,37.819 226.668,37.487 226.668,35.838 Opa5_LD6.6@226.63,35.8 ; v1(233.5,31.8) 233.5,31.719 234,31.219 Opa3_LD6.3@234,28.073 234,25.1 234.65,24.45 Opa3_LD6.7@234.65,23.273 ; v3(263.8,72) 265.508,70.292 265.508,43.892 268,41.4 268.9,41.4 270.3,40 270.3,38.7 v1(271.1,37.9) 271.1,37.819 270.768,37.487 270.768,35.838 Opa5_LD7.6@270.73,35.8 ; v1(277.6,31.8) 277.6,31.719 278.1,31.219 Opa3_LD7.3@278.1,28.073 278.1,25.1 278.75,24.45 Opa3_LD7.7@278.75,23.273 ; v3(309.6,72) 309.6,69.408 309.608,69.4 309.608,43.892 312.1,41.4 313,41.4 314.4,40 314.4,38.7 v1(315.2,37.9) 315.2,37.819 314.868,37.487 314.868,35.838 Opa5_LD8.6@314.83,35.8 ; v1(321.7,31.8) 321.7,31.719 322.2,31.219 Opa3_LD8.3@322.2,28.073 322.2,25.1 322.85,24.45 Opa3_LD8.7@322.85,23.273
  Top Layer w0.6: v1@169.9,72 v1@172.7,72 ; v3(171.3,72) 171.3,73.5 ; 171.3,73.7 R9-1.2@171.3,119.6
  Bottom Layer w0.4: v1(6.5,37.9) 12.543,31.857 12.943,31.857 v1(13,31.8) ; v1(50.6,37.9) 56.643,31.857 57.043,31.857 v1(57.1,31.8) ; v1(94.7,37.9) 100.743,31.857 101.143,31.857 v1(101.2,31.8) ; v1(138.8,37.9) 144.843,31.857 145.243,31.857 v1(145.3,31.8) ; v1(182.9,37.9) 188.943,31.857 189.343,31.857 v1(189.4,31.8) ; v1(227,37.9) 233.043,31.857 233.443,31.857 v1(233.5,31.8) ; v1(271.1,37.9) 277.143,31.857 277.543,31.857 v1(277.6,31.8) ; v1(315.2,37.9) 321.243,31.857 321.643,31.857 v1(321.7,31.8)
  Bottom Layer w0.6: v3(1,71.2) 1,71.5 1.5,72 v3(87.4,72) v3(132,72) v1(170.1,72) v3(171.3,72) v1(172.6,72) v3(176.7,72) v3(220.9,72) v3(263.8,72) v3(309.6,72)
VLed1: C2-8.1 CE-2.1 J1-3A.2 LED1-4.2 LED1_LD1.2 LED1_LD2.2 LED1_LD3.2 LED1_LD4.2 LED1_LD5.2 VReg_1.7 VReg_1.8 | length 22.5
  Top Layer w0.4: LED1-4.2@213.5,158.5 213.51,158.49 VReg_1.7@220.06,158.49
  Top Layer w4: LED1_LD1.2@20.6,12.9 LED1_LD1.2@21.4,12.9 ; LED1_LD1.2@21.2,12.8 21.5,12.5 21.5,10.534 ; LED1_LD2.2@64.7,12.9 LED1_LD2.2@65.5,12.9 ; LED1_LD2.2@65.3,12.8 65.6,12.5 65.6,10.534 ; LED1_LD3.2@108.8,12.9 LED1_LD3.2@109.6,12.9 ; LED1_LD3.2@109.4,12.8 109.7,12.5 109.7,10.534 ; LED1_LD4.2@152.9,12.9 LED1_LD4.2@153.7,12.9 ; LED1_LD4.2@153.5,12.8 153.8,12.5 153.8,10.534 ; LED1_LD5.2@197,12.9 LED1_LD5.2@197.8,12.9 ; LED1_LD5.2@197.6,12.8 197.9,12.5 197.9,10.534
VLed6: J1-3A.1 J1-3B.1 LED1_LD6.2 | length 3.2
  Top Layer w4: LED1_LD6.2@241.1,12.9 LED1_LD6.2@241.9,12.9 ; LED1_LD6.2@241.7,12.8 242,12.5 242,10.534
VLed7: C2-11.1 CE-4.1 J1-3B.2 LED1-3.2 LED1_LD7.2 LED1_LD8.2 VReg_2.7 VReg_2.8 | length 131.3
  Top Layer w0.4: LED1-3.2@297.1,158.8 297.41,158.49 VReg_2.7@306.06,158.49
  Top Layer w1: CE-4.1@298.9,139.6 298.9,139.421 299.221,139.1 C2-11.1@304.8,139.1
  Top Layer w4: LED1_LD7.2@285.2,12.9 LED1_LD7.2@286,12.9 ; LED1_LD7.2@285.8,12.8 286.1,12.5 286.1,10.534 ; LED1_LD8.2@329.3,12.9 LED1_LD8.2@330.1,12.9 ; LED1_LD8.2@329.9,12.8 330.2,12.5 330.2,10.534
  Top Layer w8: 296.7,130 296.7,137.6 ; CE-4.1@298.9,139.6 306.8,147.5 306.8,156 ; 301.7,11.6 302.1,12
  Top Layer w9: 302.6,12 302.6,32.9
  Top Layer w10: 287.55,120.85 295.6,128.9 ; 295.2,79.5 302.1,72.6 302.1,32.9
VRef1: OpAmp-1.4 R3-4.1 | length 4.2
  Top Layer w0.3: R3-4.1@171.6,154.5 171.895,154.795 171.895,155.795 172.465,156.365 OpAmp-1.4@172.465,158.329
pads on no net: Fan1.0 Fan2.0 Fan3.0 Fan4.0 Fan5.0 H1.14 H1.16 H1.18 H1.19 H2.5 I1.3 I2.3 Iso-1.2 Iso-1.4 Iso-1.8 Iso-1.10 Iso-1.13 Iso-1.15 Iso-3.5 Iso-3.6 Iso-3.7 Iso-3.10 Iso-3.11 Iso-3.12 LED1_LD1.3 LED1_LD2.3 LED1_LD3.3 LED1_LD4.3 LED1_LD5.3 LED1_LD6.3 LED1_LD7.3 LED1_LD8.3 M1_LD1.0 M1_LD2.0 M1_LD3.0 M1_LD4.0 M1_LD5.0 M1_LD6.0 M1_LD7.0 M1_LD8.0 N1.1 Opa3_LD1.4 Opa3_LD2.4 Opa3_LD3.4 Opa3_LD4.4 Opa3_LD5.4 Opa3_LD6.4 Opa3_LD7.4 Opa3_LD8.4 Ref1.1 Ref1.3 Ref1.5 Ref1.7 Ref1.8
copper on no net: | length 0
  other v1: 305.9,102.6 306.6,102.6 307.5,102.6 308.2,102.6 320.1,102.6 320.8,102.6 321.7,102.6 322.4,102.6 305.9,103.4 306.7,103.4 307.4,103.4 308.2,103.4 320.1,103.4 320.9,103.4 321.6,103.4 322.4,103.4 305.9,104.2 306.7,104.2 307.4,104.2 308.2,104.2 320.1,104.2 320.9,104.2 321.6,104.2 322.4,104.2

## Polygon pours and split planes (outlines as drawn)
GND on Top Layer "NONET_L01_P-001" (solid, remove dead copper, pour order 130): 200.8,159.8 200.8,64.4 -0.043,64.4 -0.043,159.8
GND on Top Layer "NONET_L01_P-001" (solid, remove dead copper, pour order 138): 278.1,95.3 278.1,64.4 230.952,64.4 230.952,95.3
GND on Top Layer "NONET_L01_P-001" (solid, remove dead copper, pour order 85): 14.337,16.6 0,16.6 0,69.8 14.337,69.8
GND_IN on Top Layer "NONET_L01_P-001" (solid, remove dead copper, pour order 128): 190.4,185 190.4,162.7 130.1,162.7 130.1,185
VLed1 on Top Layer "NONET_L01_P-001" (solid, pour order 139): 216.8,146.2 216.8,72.7 204.1,72.7 204.1,146.2
GND on Top Layer "NONET_L01_P-001" (solid, remove dead copper, pour order 131): 354.2,126.3 354.2,64.4 308.9,64.4 308.9,126.3
VLed7 on Top Layer "NONET_L01_P-001" (solid, remove dead copper, pour order 124): 298.5,123.5 298.5,73.8 281.4,73.8 281.4,123.5
Vin on Top Layer "NONET_L01_P-001" (solid, remove dead copper, pour order 121): 354.8,115.2 354.8,20.5 344.7,20.5 344.7,115.2
GND on Top Layer "NONET_L01_P-001" (solid, remove dead copper, pour order 84): 323.037,16.7 308.7,16.7 308.7,69.8 323.037,69.8
GND on Top Layer "NONET_L01_P-001" (solid, remove dead copper, pour order 83): 278.937,16.6 263.1,16.6 263.1,69.8 278.937,69.8
GND on Top Layer "NONET_L01_P-001" (solid, remove dead copper, pour order 82): 234.837,16.7 220.5,16.7 220.5,69.8 234.837,69.8
GND on Top Layer "NONET_L01_P-001" (solid, remove dead copper, pour order 81): 190.737,16.8 175.2,16.8 175.2,69.8 190.737,69.8
GND on Top Layer "NONET_L01_P-001" (solid, remove dead copper, pour order 80): 146.637,16.6 130.6,16.6 130.6,69.8 146.637,69.8
GND on Top Layer "NONET_L01_P-001" (solid, remove dead copper, pour order 79): 102.537,16.6 86.4,16.6 86.4,69.8 102.537,69.8
GND on Top Layer "NONET_L01_P-001" (solid, remove dead copper, pour order 78): 58.437,16.5 42.8,16.5 42.8,69.8 58.437,69.8
GND on Top Layer "NONET_L01_P-001" (solid, remove dead copper, pour order 137): 348.8,119.4 348.8,85.2 300.3,85.2 300.3,119.4
Vin on Top Layer "NONET_L01_P-001" (solid, remove dead copper, pour order 125): 270.86,184.951 380,184.951 380,144.9 270.86,144.9
GND on Top Layer "NONET_L01_P-001" (solid, remove dead copper, pour order 132): 355.5,133 355.5,123.1 315.1,123.1 315.1,133
GND on Top Layer "NONET_L01_P-001" (solid, remove dead copper, pour order 93): 295,33.316 273,33.316 273,69.8 295,69.8
GND on Top Layer "NONET_L01_P-001" (solid, remove dead copper, pour order 92): 204.5,33.316 184.8,33.316 184.8,69.8 204.5,69.8
GND on Top Layer "NONET_L01_P-001" (solid, remove dead copper, pour order 91): 30.4,33.316 8.4,33.316 8.4,69.8 30.4,69.8
GND on Top Layer "NONET_L01_P-001" (solid, remove dead copper, pour order 90): 74.5,33.316 52.5,33.316 52.5,69.8 74.5,69.8
GND on Top Layer "NONET_L01_P-001" (solid, remove dead copper, pour order 89): 118.6,33.316 96.6,33.316 96.6,69.8 118.6,69.8
GND on Top Layer "NONET_L01_P-001" (solid, remove dead copper, pour order 88): 162.7,33.316 140.7,33.316 140.7,69.8 162.7,69.8
GND on Top Layer "NONET_L01_P-001" (solid, remove dead copper, pour order 87): 250.9,33.316 228.9,33.316 228.9,69.8 250.9,69.8
GND on Top Layer "NONET_L01_P-001" (solid, remove dead copper, pour order 86): 336.8,33.316 317.1,33.316 317.1,69.8 336.8,69.8
Vin on Top Layer "NONET_L01_P-001" (solid, remove dead copper, pour order 119): 380.1,185 380.1,14 356.5,14 356.5,185
VLed1 on Top Layer "NONET_L01_P-001" (solid, remove dead copper, pour order 123): 228,160.3 228,83.9 215.3,83.9 215.3,160.3
VLed1 on Top Layer "NONET_L01_P-001" (solid, pour order 122): 219.3,146.2 219.3,11.6 207.5,11.6 207.5,146.2
Vin on Top Layer "NONET_L01_P-001" (solid, pour order 120): 361.7,26.8 361.7,20.5 352.3,20.5 352.3,26.8
VLed1 on Top Layer "NONET_L01_P-001" (solid, remove dead copper, pour order 45): 88.1,0.4 43.7,0.4 43.7,14.3 88.1,14.3
GNDN on Top Layer "NONET_L01_P-001" (solid, remove dead copper, pour order 77): 330,32 330,30 324.1,30 324.1,32
VLed7 on Top Layer "NONET_L01_P-001" (solid, remove dead copper, pour order 44): 332.2,0.4 316.3,0.4 316.3,14.3 332.2,14.3
GNDN on Top Layer "NONET_L01_P-001" (solid, remove dead copper, pour order 76): 285.9,32 285.9,30 280,30 280,32
VLed7 on Top Layer "NONET_L01_P-001" (solid, remove dead copper, pour order 43): 316.8,0.4 272.2,0.4 272.2,14.3 316.8,14.3
GNDN on Top Layer "NONET_L01_P-001" (solid, remove dead copper, pour order 75): 241.8,32 241.8,30 235.9,30 235.9,32
VLed6 on Top Layer "NONET_L01_P-001" (solid, remove dead copper, pour order 42): 268.1,0.4 224.2,0.4 224.2,14.3 268.1,14.3
GNDN on Top Layer "NONET_L01_P-001" (solid, remove dead copper, pour order 74): 197.7,32 197.7,30 191.8,30 191.8,32
VLed1 on Top Layer "NONET_L01_P-001" (solid, remove dead copper, pour order 41): 220.4,0.4 175.9,0.4 175.9,14.3 220.4,14.3
GNDN on Top Layer "NONET_L01_P-001" (solid, remove dead copper, pour order 73): 153.6,32 153.6,30 147.7,30 147.7,32
VLed1 on Top Layer "NONET_L01_P-001" (solid, remove dead copper, pour order 40): 176.3,0.4 132.1,0.4 132.1,14.3 176.3,14.3
GNDN on Top Layer "NONET_L01_P-001" (solid, remove dead copper, pour order 72): 109.5,32 109.5,30 103.6,30 103.6,32
VLed1 on Top Layer "NONET_L01_P-001" (solid, remove dead copper, pour order 39): 132.2,0.4 88,0.4 88,14.3 132.2,14.3
GNDN on Top Layer "NONET_L01_P-001" (solid, remove dead copper, pour order 71): 65.4,32 65.4,30 59.5,30 59.5,32
VLed1 on Top Layer "NONET_L01_P-001" (solid, remove dead copper, pour order 38): 44,0.4 12.9,0.4 12.9,14.3 44,14.3
GNDN on Top Layer "NONET_L01_P-001" (solid, remove dead copper, pour order 70): 21.3,32 21.3,30 15.4,30 15.4,32
GNDN on Bottom Layer "NONET_L01_P-001" (solid, remove dead copper, pour order 118): 380,185 380,0 358.7,0 358.7,185
GND on Bottom Layer "NONET_L01_P-001" (solid, remove dead copper, pour order 134): 200.8,159.8 200.8,64.4 -0.043,64.4 -0.043,159.8
GND_IN on Bottom Layer "NONET_L01_P-001" (solid, remove dead copper, pour order 129): 190.4,185 190.4,162.7 130.1,162.7 130.1,185
GND on Bottom Layer "NONET_L01_P-001" (solid, remove dead copper, pour order 101): 11,15.4 0,15.4 0,27.8 11,27.8
GND on Bottom Layer "NONET_L01_P-001" (solid, remove dead copper, pour order 100): 55.1,15.4 44.1,15.4 44.1,27.8 55.1,27.8
GND on Bottom Layer "NONET_L01_P-001" (solid, remove dead copper, pour order 99): 99.2,15.4 88.2,15.4 88.2,27.8 99.2,27.8
GND on Bottom Layer "NONET_L01_P-001" (solid, remove dead copper, pour order 98): 143.3,15.4 132.3,15.4 132.3,27.8 143.3,27.8
GND on Bottom Layer "NONET_L01_P-001" (solid, remove dead copper, pour order 97): 187.4,15.4 176.4,15.4 176.4,27.8 187.4,27.8
GND on Bottom Layer "NONET_L01_P-001" (solid, remove dead copper, pour order 96): 231.5,15.4 220.5,15.4 220.5,27.8 231.5,27.8
GND on Bottom Layer "NONET_L01_P-001" (solid, remove dead copper, pour order 95): 275.6,15.4 264.6,15.4 264.6,27.8 275.6,27.8
GND on Bottom Layer "NONET_L01_P-001" (solid, remove dead copper, pour order 94): 319.7,15.4 308.7,15.4 308.7,27.8 319.7,27.8
GND on Bottom Layer "NONET_L01_P-001" (solid, remove dead copper, pour order 141): 357.7,119.4 357.7,84.9 300.3,84.9 300.3,119.4
GND on Bottom Layer "NONET_L01_P-001" (solid, remove dead copper, pour order 135): 357.9,88.2 357.9,64.4 199.757,64.4 199.757,88.2
no net on Bottom Layer "NONET_L01_P-001" (solid, remove dead copper, pour order 140): 305.4,104.7 305.4,102.1 308.7,102.1 308.7,104.7
GND on Bottom Layer "NONET_L01_P-001" (solid, remove dead copper, pour order 136): 355.5,133 355.5,117.7 313.6,117.7 313.6,133
GND on Bottom Layer "NONET_L01_P-001" (solid, remove dead copper, pour order 133): 343.4,64.6 357.9,64.6 357.9,14.9 343.4,14.9
GNDN on Bottom Layer "NONET_L01_P-001" (solid, remove dead copper, pour order 127): 309.3,156.6 309.3,133.7 208.5,133.7 208.5,156.6
GNDN on Bottom Layer "NONET_L01_P-001" (solid, remove dead copper, pour order 126): 361.5,185 361.5,149 208.5,149 208.5,185
GNDN on Bottom Layer "NONET_L01_P-001" (solid, pour order 53): 308.6,0 264.2,0 264.2,14.3 308.6,14.3
GNDN on Bottom Layer "NONET_L01_P-001" (solid, pour order 69): 335.4,17.6 335.4,14.1 321.5,14.1 321.5,17.6
GNDN on Bottom Layer "NONET_L01_P-001" (solid, remove dead copper, pour order 52): 380,0 308.3,0 308.3,14.3 380,14.3
GNDN on Bottom Layer "NONET_L01_P-001" (solid, remove dead copper, pour order 61): 329.831,32 329.831,14.1 324.3,14.1 324.3,32
GND on Bottom Layer "NONET_L01_P-001" (solid, remove dead copper, pour order 109): 322.9,19.8 308.7,19.8 308.7,34.9 322.9,34.9
GND on Bottom Layer "NONET_L01_P-001" (solid, remove dead copper, pour order 117): 336.7,33.3 308.5,33.3 308.5,69.8 336.7,69.8
GNDN on Bottom Layer "NONET_L01_P-001" (solid, pour order 68): 291.3,17.6 291.3,14.1 277.4,14.1 277.4,17.6
GNDN on Bottom Layer "NONET_L01_P-001" (solid, remove dead copper, pour order 60): 285.731,32 285.731,14.1 280.2,14.1 280.2,32
GND on Bottom Layer "NONET_L01_P-001" (solid, remove dead copper, pour order 108): 278.8,19.8 264.6,19.8 264.6,34.9 278.8,34.9
GND on Bottom Layer "NONET_L01_P-001" (solid, remove dead copper, pour order 116): 295,33.3 258.8,33.3 258.8,69.8 295,69.8
GNDN on Bottom Layer "NONET_L01_P-001" (solid, pour order 67): 247.2,17.6 247.2,14.1 233.3,14.1 233.3,17.6
GNDN on Bottom Layer "NONET_L01_P-001" (solid, pour order 51): 264.5,0 220.2,0 220.2,14.3 264.5,14.3
GNDN on Bottom Layer "NONET_L01_P-001" (solid, remove dead copper, pour order 59): 241.631,32 241.631,14.1 236.1,14.1 236.1,32
GND on Bottom Layer "NONET_L01_P-001" (solid, remove dead copper, pour order 107): 234.7,19.959 220.5,19.959 220.5,34.9 234.7,34.9
GND on Bottom Layer "NONET_L01_P-001" (solid, remove dead copper, pour order 115): 250.9,33.3 220,33.3 220,69.8 250.9,69.8
GNDN on Bottom Layer "NONET_L01_P-001" (solid, pour order 66): 203.1,17.6 203.1,14.1 189.2,14.1 189.2,17.6
GNDN on Bottom Layer "NONET_L01_P-001" (solid, pour order 50): 220.4,0 175.8,0 175.8,14.3 220.4,14.3
GNDN on Bottom Layer "NONET_L01_P-001" (solid, remove dead copper, pour order 58): 197.531,32 197.531,14.1 192,14.1 192,32
GND on Bottom Layer "NONET_L01_P-001" (solid, remove dead copper, pour order 106): 190.6,20.283 176.4,20.283 176.4,34.9 190.6,34.9
GND on Bottom Layer "NONET_L01_P-001" (solid, remove dead copper, pour order 114): 204.3,33.3 170.6,33.3 170.6,69.8 204.3,69.8
GNDN on Bottom Layer "NONET_L01_P-001" (solid, pour order 65): 159,17.6 159,14.1 145.1,14.1 145.1,17.6
GNDN on Bottom Layer "NONET_L01_P-001" (solid, pour order 49): 176.3,0 131.9,0 131.9,14.3 176.3,14.3
GNDN on Bottom Layer "NONET_L01_P-001" (solid, remove dead copper, pour order 57): 153.431,32 153.431,14.1 147.9,14.1 147.9,32
GND on Bottom Layer "NONET_L01_P-001" (solid, remove dead copper, pour order 105): 146.5,19.8 132.3,19.8 132.3,34.9 146.5,34.9
GND on Bottom Layer "NONET_L01_P-001" (solid, remove dead copper, pour order 113): 162.7,33.3 126.6,33.3 126.6,69.8 162.7,69.8
GNDN on Bottom Layer "NONET_L01_P-001" (solid, pour order 64): 114.9,17.6 114.9,14.1 101,14.1 101,17.6
GNDN on Bottom Layer "NONET_L01_P-001" (solid, pour order 48): 132.2,0 87.8,0 87.8,14.3 132.2,14.3
GNDN on Bottom Layer "NONET_L01_P-001" (solid, remove dead copper, pour order 56): 109.331,32 109.331,14.1 103.8,14.1 103.8,32
GND on Bottom Layer "NONET_L01_P-001" (solid, remove dead copper, pour order 104): 102.4,19.959 88.2,19.959 88.2,34.9 102.4,34.9
GND on Bottom Layer "NONET_L01_P-001" (solid, remove dead copper, pour order 112): 118.6,33.3 82.6,33.3 82.6,69.8 118.6,69.8
GNDN on Bottom Layer "NONET_L01_P-001" (solid, pour order 63): 70.8,17.6 70.8,14.1 56.9,14.1 56.9,17.6
GNDN on Bottom Layer "NONET_L01_P-001" (solid, pour order 47): 88.1,0 43.5,0 43.5,14.3 88.1,14.3
GNDN on Bottom Layer "NONET_L01_P-001" (solid, remove dead copper, pour order 55): 65.231,32 65.231,14.1 59.7,14.1 59.7,32
GND on Bottom Layer "NONET_L01_P-001" (solid, remove dead copper, pour order 103): 58.3,19.8 44.1,19.8 44.1,34.9 58.3,34.9
GND on Bottom Layer "NONET_L01_P-001" (solid, remove dead copper, pour order 111): 74.5,33.3 39.4,33.3 39.4,69.8 74.5,69.8
GND on Bottom Layer "NONET_L01_P-001" (solid, remove dead copper, pour order 110): 30.4,33.3 0,33.3 0,69.8 30.4,69.8
GND on Bottom Layer "NONET_L01_P-001" (solid, remove dead copper, pour order 102): 14.2,20.383 0,20.383 0,34.9 14.2,34.9
GNDN on Bottom Layer "NONET_L01_P-001" (solid, remove dead copper, pour order 54): 21.131,32 21.131,14.1 15.6,14.1 15.6,32
GNDN on Bottom Layer "NONET_L01_P-001" (solid, pour order 46): 44,0 12.3,0 12.3,14.3 44,14.3
GNDN on Bottom Layer "NONET_L01_P-001" (solid, pour order 62): 26.7,17.6 26.7,14.1 12.8,14.1 12.8,17.6
no net on Bottom Solder "NONET_L01_P-001" (solid, remove dead copper, pour order 36): 319.65,104.742 319.65,102.142 322.95,102.142 322.95,104.742
no net on Bottom Solder "NONET_L01_P-001" (solid, remove dead copper, pour order 32): 305.4,104.7 305.4,102.1 308.7,102.1 308.7,104.7

## Silkscreen, mask and mechanical layers (free items; w line width, h text height)
Top Overlay:
  lines w0.25: 126.144,160.764 192.8,160.7 ; 126.144,161.358 192.8,161.294
  lines w0.5: 130.1,185 130.1,162.7 190.4,162.7 190.4,185
  text "Isolation" at 130.65,184.25 h2 r270
  text "Input Voltage: 24V / Total_Power: 200W / Max current/Channel: 15A / Max Total Current: 40A / WARNING: Be careful with thermals + light levels when running anything continuously above 5A." at 9.3,183.8 h2 r270
  text "LED Control V1.0 / H. Steel / 27/10/2023" at 34.7,183.4 h4 r270
  text "Link" at 164.15,171.85 h2 r270
  text "VLed2" at 291.25,165.85 h2 r270
  text "VLed1" at 207.45,164.65 h2 r270
  text "Heartbeat" at 125.65,158.65 h2 r270
  text "6.5V" at 300.25,117.95 h2 r270
  text "5V" at 308.55,93.65 h2 r270
  text "3.3V" at 322.75,93.45 h2 r270
  text "Power" at 360.35,15.95 h2 r270
  text "L1" at 9.4,7.5 h4 r270
  text "L2" at 52.2,7.5 h4 r270
  text "L3" at 96.7,7.5 h4 r270
  text "L4" at 140.7,7.5 h4 r270
  text "L5" at 185.1,7.5 h4 r270
  text "L6" at 229.5,7.5 h4 r270
  text "L7" at 273.5,7.5 h4 r270
  text "L8" at 317,7.5 h4 r270
  text "WARNING!" at 222.25,6.65 h1 r90
  text "Dont jump / with J1-3B" at 224.1,6.6 h0.5 r90
  text "WARNING!" at 266.823,0.481 h1 r90
  text "Dont jump with J1-3A" at 267.706,0.431 h0.5 r90
Mechanical 1:
  the board outline again, w0.254
Mechanical 13:
  lines w0.254: -39.2,120.8 -39.2,-32.8 252.5,-32.8 252.5,120.8 ; 8.8,86.7 300.5,86.7